# Altium PCB VA_HUB_PCB.PcbDoc (part 6 of 12)
Units mil, origin at the board's own origin, x right, y up, seen from the top; angles counter-clockwise.
Board outline 4408 x 3619 mil, 8 copper layers (Top Layer, Routing 1, Routing 2, Power Plane, GND Plane, Routing 3, Routing 4, Bottom Layer), stack 85.156 mil thick; 569 components, 440 nets, 2911 pads, 1518 vias.
Unrouted connection lines stored in the file: 46.
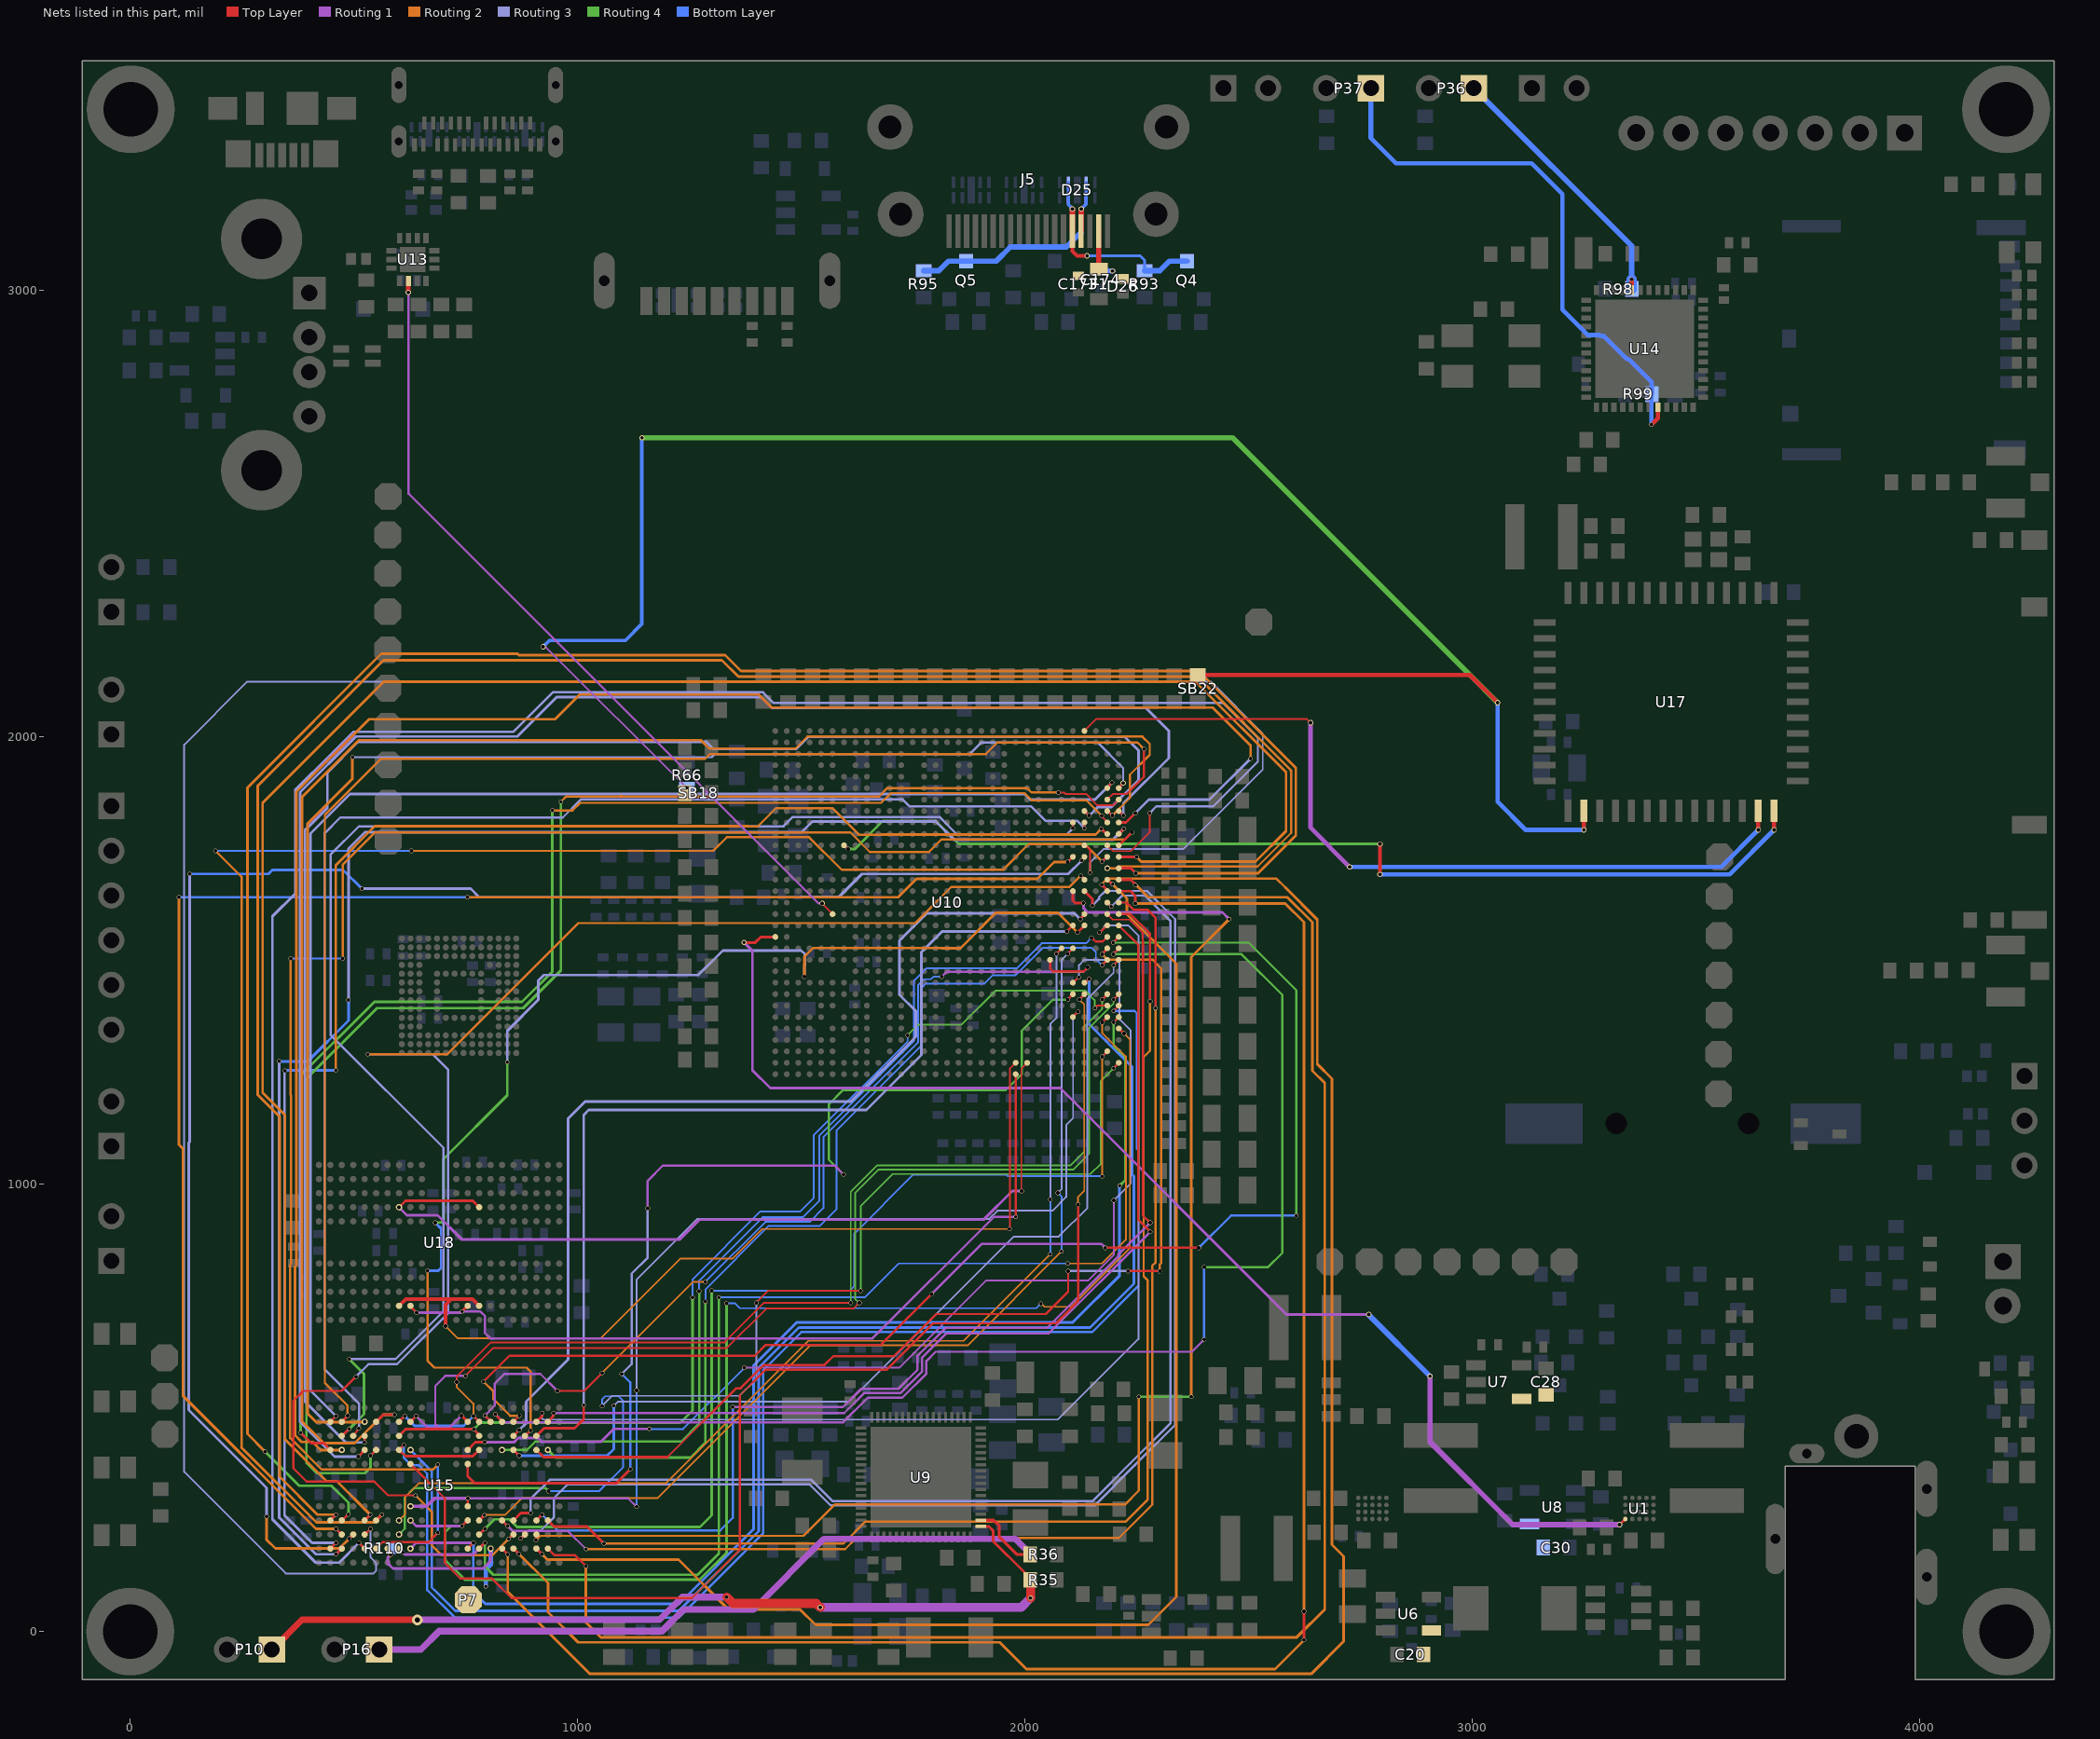
[diagram p9: the nets of this part, all layers, seen from the top]

## Part data (continued)
U15 U18: "FBGA-200 DDR SDRAM ROHS", Manufacturer=Samsung, ComponentLink1Description=LCSC, ComponentLink1URL=https://www.lcsc.com/product-detail/DDR-SDRAM_Samsung-K4F6E3S4HM-MGCJ_C2842431.html, Manufacturer Part Number=K4F6E3S4HM-MGCJ
U16: "BGA-153 eMMC ROHS", Manufacturer=FORESEE, ComponentLink1Description=LCSC, ComponentLink1URL=https://lcsc.com/product-detail/eMMC_FORESEE-FSEIASLD-64G_C719922.html, Manufacturer Part Number=FSEIASLD-64G
U17: "802.11ac/a/b/g/n 2x2 WiFi with Bluetooth5.0 Combo SIP Module", Manufacturer=SparkLAN, ComponentLink1Description=Verical, ComponentLink1URL=https://www.verical.com/pd/sparklan-communicationslnc.-combo-wireless-module-ap6398s-7079266?utm_medium=datasheet&utm_source=pdf&utm_content=link&utm_term=AP6398S&utm_campaign=datasheet_coverpage_2017, Manufacturer Part Number=AP6398S
X1 X4: "CRYSTAL 32.7680KHZ 12.5PF SMD", Case/Package=SMD/SMT, ESR (Equivalent Series Resistance)=70kR, Frequency=32.768kHz, Frequency Tolerance=20ppm, Load Capacitance=12.5pF, Manufacturer=NDK, Max Operating Temperature=85°C, Min Operating Temperature=-40°C, Package Quantity=1000, Supplier Part Number 1=644-1156-6-ND, ComponentLink1Description=https://media.digikey.com/pdf/Data%20Sheets/NDK%20PDFs/NX3215SA-32.768K-STD-MUA-8.pdf?src-supplier=Digi-Key, ComponentLink1URL=https://media.digikey.com/pdf/Data%20Sheets/NDK%20PDFs/NX3215SA-32.768K-STD-MUA-8.pdf?src-supplier=Digi-Key, ComponentLink2Description=http://www.ndk.com/images/products/catalog/c_NX3215SA-STD-MUA-14_e.pdf?src-supplier=Digi-Key, ComponentLink2URL=http://www.ndk.com/images/products/catalog/c_NX3215SA-STD-MUA-14_e.pdf?src-supplier=Digi-Key, Height=0.035inch, Lead Free="Lead Free", Length=0.126inch, Manufacturer Part Number=NX3215SA-32.768K-STD-MUA-8, Mount="Surface Mount", Number of Pins=2, Packaging="Tape and Reel", Pricing 1="1=0.68, 10=0.602, 50=0.5628, 100=0.4974, 500=0.47124, 1000=0.3927 (USD)", Stock 1=29951, Supplier 1=Digi-Key, Width=0.059inch
X2: library part X322524MOB4SI, "24MHz SMD Crystal Resonator 12pF ±10ppm ±30ppm -40℃~+85℃ SMD3225-4P Crystals ROHS", Manufacturer="Yangxing Tech", ComponentLink1Description=LCSC, ComponentLink1URL=https://www.lcsc.com/product-detail/Crystals_Yangxing-Tech-X322524MOB4SI_C70590.html, Manufacturer Part Number=X322524MOB4SI
X3: library part 5TJ480000XYLBC, "8MHz SMD Crystal Resonator 18pF 70Ω ±10ppm ±30ppm -40℃~+85℃ SMD5032-4P Crystals ROHS", Manufacturer=JYJE, ComponentLink1Description=LCSC, ComponentLink1URL=https://lcsc.com/product-detail/Crystals_JYJE-5TJ480000XYLBC_C2149247.html, Manufacturer Part Number=5TJ480000XYLBC
X5: library part Q22FA12800078, "37.4MHz SMD Crystal Resonator 9pF 60Ω ±10ppm -40℃~+85℃ SMD2016-4P Crystals", Equivalent Series Resistance (ESR)=60Ω, Load Capacitance=9pF, Frequency=37.4MHz, Mnufacturer="Seiko Epson"

## Free pads (board coordinates)
  round 196.85 hole 122.05: MH1(1,3403.64) MH2(4193.65,3403.64) MH3(0,0) MH4(4194.65,0)

## Via types
v1: diameter 9.84, hole 7.87, Top Layer to Bottom Layer, 821 vias
v2: diameter 11.81, hole 7.87, Top Layer to Bottom Layer, 575 vias
v3: diameter 23.62, hole 11.81, Top Layer to Bottom Layer, 122 vias

## Nets (pads, with @x,y where several pads share a name; then routed paths per layer and width w, separated by ;. In a path a pad name is that pad's centre, name@x,y a point inside that pad or via, vN(x,y) a via of type N, cw(c..) or ccw(c..) an arc to the next point about the centre after c; other vN are vias at no path point)
5V#: C173.1 C174.1 D26.1 F1.2 J5.18 | length 111
  Top Layer w12: J5.18@2165.3,3131.68 2165.3,3046.81 F1.2@2165.82,3046.29
  Bottom Layer w12: C174.1@2170.64,3042 v2(2196,3042)
BOOT0: P10.1 R35.2 U9.52 | length 1981.4
  Top Layer w6: U9.52@1901.73,234.95 1919.69,234.95 1928.87,225.78 1928.87,202.8 1999.87,131.8 1999.87,127.33 R35.2@2011.87,115.33
  Top Layer w15: P10.1@315.82,-42.18 384.19,26.19 v3(642,26.19)
  Top Layer w20: v1(1333.56,77.09) 1347.64,63 1533.64,63 v2(1542.82,53.82) ; R35.2@2011.87,115.33 2012.82,114.38 v2(2012.82,74.82)
  Routing 1 w15: v3(642,26.19) 1183.19,26.19 1234.09,77.09 v1(1333.56,77.09)
  Routing 1 w20: v2(1542.82,53.82) 1991.82,53.82 v2(2012.82,74.82)
BOOT0_: P36.1 R98.2 U14.44 | length 619.5
  Top Layer w10: U14.44@3356.39,2999.25 3356.61,2999.47 3356.61,3023.17 v1(3356.39,3023.39)
  Bottom Layer w12: P36.1@3003.82,3450.82 3356.39,3098.26 v1(3356.39,3023.39)
  Bottom Layer w22: v1(3356.39,3023.39) 3356.61,3023.17 3356.61,3002.04 R98.2@3356.82,3001.82
BOOT1: P16.1 R36.2 U9.53 | length 1729.5
  Top Layer w7: U9.53@1901.73,248.73 1930.27,248.73 1942.82,236.18 1942.82,211.18 1981.67,172.33 R36.2@2011.87,172.33
  Routing 1 w14: 1393.32,49.32 1551.45,207.45 1978.55,207.45 v2(2013,173)
  Routing 1 w15: P16.1@556.82,-40.18 649.82,-40.18 691,1 1189,1 1237.32,49.32 1393.32,49.32
BOOT1_: P37.1 R99.2 U14.20 | length 1256.7
  Top Layer w10: v1(3400.82,2698.82) 3415.44,2713.44 U14.20@3415.44,2737.44
  Bottom Layer w10: 2773.82,3340.82 2773.82,3338.82 2829.82,3282.82 3132.82,3282.82 3201.82,3213.82 3201.82,2955.82 3258.64,2899 3285.32,2899 3287.5,2896.82 3294.36,2896.82 3346.04,2845.14 3350.07,2845.14 3401.75,2793.46 3401.75,2766.9 R99.2@3401.82,2766.82 3400.82,2765.82 v1(3400.82,2698.82)
  Bottom Layer w12: 2773.82,3340.82 P37.1@2773.82,3450.82
BP_RT9193: C28.1 U7.4
BT_HOST_WAKE_L: U10.AA25 U17.50 | length 2280.7
  Top Layer w6: U10.AA25@1595.87,1757.87 1596.5,1757.87 1604.37,1750 v1(1605,1750)
  Top Layer w8: v2(2794,1693) v2@2794,1760.35
  Top Layer w10: v2@3675.14,1792.42 U17.50@3675.14,1835.12
  Routing 4 w6: v1(1605,1750) 1620.52,1750 1682.52,1812 1801,1812 1852,1761 v2(2794,1761)
  Bottom Layer w10: v2(2794,1693) 3575.87,1693 v2(3675.29,1792.42)
BT_REG_ON_H: R66.1 SB18.2 SB22.2 U17.38 | length 4447.1
  Top Layer w10: SB22.2@2386.82,2138.82 2995.08,2138.82 v2(3056.91,2077) ; v2@3249.94,1792.42 U17.38@3249.94,1835.12
  Routing 1 w4: v2(923,2202) 924.49,2200.51 929.79,2200.51 v2(1243.75,1886.54)
  Routing 4 w12: v2(1144,2669) 2464.91,2669 v2(3056.91,2077)
  Bottom Layer w8: v2(923,2202) 937,2216 1107,2216 1144,2253 v2(1144,2669)
  Bottom Layer w10: v2(3056.91,2077) 3056.91,1855.09 3119.58,1792.42 v2(3250.09,1792.42)
BT_WAKE_L: U10.AL4 U17.49 | length 1868.8
  Top Layer w4: U10.AL4@2133.27,2013.77 2159.5,2040 2631,2040 v2(2639,2032)
  Top Layer w10: v2@3639.7,1792.42 U17.49@3639.7,1835.12
  Routing 1 w10: v2(2639,2032) 2639,1797 v2(2726.18,1709.82)
  Bottom Layer w10: v2(2726.18,1709.82) 3557.26,1709.82 v2(3639.85,1792.42)
BYP_SPX3819: C20.1 U6.4
BYP_SPX3819_SD: C30.1 U8.4
CHG_CC0_INT_L: U10.R26 U13.5 | length 1813
  Top Layer w4: v2(1547.06,1628.11) 1547.06,1627.54 U10.R26@1570.28,1604.33
  Top Layer w8: v2(621.83,2994.22) v2@621.91,2994.3 ; U13.5@621.91,3019.92 U13.5@621.98,3019.99
  Top Layer w10: v2@621.91,2994.3 U13.5@621.91,3019.92
  Routing 1 w5: 621.83,2544.17 v2(621.83,2994.22) ; 622.83,2544.17 1538.5,1628.5 1546.67,1628.5 v2(1547.06,1628.11)
CPU_B_SLEEP_H: U1.A1 U10.N31 | length 2831.9
  Top Layer w6: v2(1372.42,1540.67) 1397.36,1540.67 1409.84,1553.14 U10.N31@1442.33,1553.14 ; v2(3329.82,238.82) U1.A1@3342.58,251.58
  Routing 1 w6: v2(1372.42,1540.67) 1391,1522.09 1391,1255 1431,1215 2079,1215 2585,709 v2(2769,709)
  Routing 1 w12: v2(2905.92,571) 2905.92,424.08 3091.18,238.82 v2(3329.82,238.82)
  Bottom Layer w12: v2@2768.5,708.5 v2@2905.46,571.54
DDC_SCL: D25.2 D25.9 J5.15 Q4.3 R93.2 | length 455.3
  Top Layer w8: J5.15@2106.25,3131.68 2106.25,3086.75 2117,3076 v2(2139,3076)
  Top Layer w12: J5.15@2106.25,3131.68 v2@2106.25,3180.93
  Bottom Layer w6: v2(2139,3076) 2258,3076 2267.82,3066.18 R93.2@2267.82,3042.82
  Bottom Layer w8: D25.2@2097.63,3240.22 2097.63,3190.72 2106.31,3182.03 v2(2106.31,3181) v2@2105.59,3181.73
  Bottom Layer w12: R93.2@2267.82,3042.82 2301.82,3042.82 2323.15,3064.15 Q4.3@2362.83,3064.15
DDC_SDA: D25.4 D25.7 J5.16 Q5.3 R95.2 | length 553
  Top Layer w12: J5.16@2125.93,3131.68 2125.93,3180.93 v2(2126,3181)
  Bottom Layer w8: v2(2126,3181) 2137,3192 D25.7@2137,3205.78 D25.4@2137,3240.22
  Bottom Layer w12: R95.2@1773.82,3042.82 1807.82,3042.82 1829.15,3064.15 Q5.3@1868.83,3064.15 1936.15,3064.15 1968,3096 2093,3096 2126,3129 v2(2126,3181)
DDR0.DDR0_A0: U10.F2 U15.H2 U15.R2 | length 2889.3
  Top Layer w5: v1@2173,1362.21 U10.F2@2184.45,1373.67
  Top Layer w6: U15.H2@601.05,185.51 601.05,184.85 v1(608.9,177) ; U15.R2@780.18,185.51 v1(792.98,198.31)
  Routing 1 w6: v1(608.9,177) 613.44,172.47 767.13,172.47 v1(792.98,198.31)
  Routing 4 w6: v1(792.98,198.31) 792.98,146.02 812,127 1268.44,127 1316,174.56 v1(1316,747)
  Routing 2 w4: v1(2096,823) 2173,823 2226,876 2226,1286 2173,1339 v1(2173,1361.87)
  Bottom Layer w4: v1(1316,747) 1642,747 1718,823 v1(2096,823)
DDR0.DDR0_A1: U10.F1 U15.J2 U15.P2 | length 2846.7
  Top Layer w5: v1@2198.59,1362.21 U10.F1@2210.04,1373.67
  Top Layer w6: U15.P2@754.59,185.51 v1(767.39,198.31)
  Routing 1 w6: v1(626.39,185.39) 639.31,198.31 v1(767.39,198.31)
  Routing 4 w6: v1(2198.59,1361.87) 2198.59,1310.41 2225,1284 2225,1010 v1(2212,997)
  Bottom Layer w6: v1(767.39,198.31) 767.39,173.14 767.13,172.88 767.13,88.87 794,62 1227,62 1393.92,228.92 1393.92,594.81 1490.03,690.92 2106.92,690.92 2212,796 v1(2212,997)
DDR0.DDR0_A2: U10.G1 U15.H9 U15.R9 | length 3379.7
  Top Layer w5: v1@2198.59,1387.8 U10.G1@2210.04,1399.26
  Top Layer w6: U15.H9@601.05,405.98 615.13,391.9 766.09,391.9 U15.R9@780.18,405.98 ; U15.H9@601.05,405.98 v1@612,416.97
  Bottom Layer w5: v1(612,417) 612,388 628.53,371.47 645.53,371.47 664,353 664,93 725.71,31.29 1226.7,31.29 1415.42,220.02 1415.42,584.42 1500.42,669.42 2150.57,669.42 2254.42,773.27 2254.42,1075.92 2250.67,1079.67 2250.67,1382.33 2245.54,1387.46 v1(2198.59,1387.46)
DDR0.DDR0_A3: U10.G2 U15.H10 U15.R10 | length 2305.2
  Top Layer w5: v1(2157,1394) 2162.6,1399.6 2184.11,1399.6 U10.G2@2184.41,1399.3
  Top Layer w6: U15.H10@601.05,437.48 615.84,452.28 v1(768.39,452.28) 768.39,451.24 780.18,439.44 U15.R10@780.18,437.48
  Routing 4 w4: v1(1738,1333) 1762,1357 1859,1357 1935,1433 2135,1433 2156,1412 v1@2156,1394
  Routing 4 w6: v1(768.39,452.28) 783.11,467 1229.88,467 1257,494.12 v1(1257,747)
  Bottom Layer w4: v1(1257,747) 1257,787 1409.32,939.32 1498.16,939.32 1528,969.16 1528,1109.13 1738,1319.13 v1(1738,1333)
DDR0.DDR0_A4: U10.H2 U15.H11 U15.R11 | length 2440.2
  Top Layer w4: v1(730,558) 730,570 806.73,646.73 1328.73,646.73 1417,735 v1(1611,735)
  Top Layer w5: v1@2173,1413.39 U10.H2@2184.45,1424.85
  Top Layer w6: U15.H11@601.05,468.98 U15.H11@601.05,468.98 613.84,481.84 v1(613.84,481.9) ; v1(767.39,481.77) U15.R11@780.18,468.98
  Routing 4 w4: v1@1611,736 1611,789 1611,983 1670.5,1042.5 2102.5,1042.5 2133,1073 2133,1352 2173,1392 v1(2173,1413.05)
  Routing 2 w4: v1(730,558) 730,547 767.39,509.61 v1(767.39,481.77)
  Bottom Layer w5: v1@613.84,481.77 v1(613.84,481.9)
  Bottom Layer w6: v1@613.84,481.77 635.62,460 745.61,460 v1(767.39,481.77)
DDR0.DDR0_A5: U10.H1 U15.J11 U15.P11 | length 2474.4
  Top Layer w4: v1(749.5,571.5) 812,634 1334,634 1422,722 1617,722 v1(1630,735)
  Top Layer w5: v1@2198.59,1413.39 U10.H1@2210.04,1424.85
  Top Layer w6: U15.J11@626.64,468.98 U15.J11@626.64,468.98 639.43,481.84 v1(639.43,481.9) ; v1(740.5,483.07) 745.14,478.43 U15.P11@754.59,468.98
  Routing 1 w5: 689.32,456 682,463.32 682,549 704.5,571.5 v1(749.5,571.5)
  Routing 1 w6: v1(639.43,481.9) 639.43,481.77 665.21,456 689.32,456 713.43,456 v1(740.5,483.07)
  Routing 4 w4: v1(1630,735) 1620.82,744.18 1620.82,794.73 1620.82,980.09 1673.73,1033 2108.56,1033 2144,1068.44 2144,1350 2198.59,1404.59 v1(2198.59,1413.05)
DDR0_CKE0: U10.E1 U15.J4 U15.P4 | length 2943.4
  Top Layer w5: U10.E1@2210.39,1348.42 v1@2221.84,1336.97
  Top Layer w6: v1(741.79,235.71) U15.P4@754.59,248.5
  Routing 1 w6: v1(626.64,248.5) 639.43,235.71 v1(741.79,235.71)
  Routing 4 w6: v1(741.79,235.71) 717.71,235.71 704,222 704,160.11 748.11,116 1273,116 1333,176 v1(1333,734)
  Routing 2 w4: v1(2036,733) 2037.44,733 2044.44,726 2104,726 2235,857 2235,1324.15 v1(2222.19,1336.97)
  Bottom Layer w4: v1(1333,734) 1352,734 1363,723 2026,723 v1(2036,733)
DDR0_CKE1: U10.F5 U15.J5 U15.P5 | length 2525.5
  Top Layer w5: U10.F5@2107.68,1374.36 v1@2119.13,1385.81
  Top Layer w6: v1@754,298 754.59,297.41 U15.P5@754.59,280
  Routing 1 w5: v1(755,298) 1113,298 v1(1132,279)
  Routing 1 w8: v1(626.89,280) 662.89,280 680.89,298 v1(755,298)
  Routing 3 w4: v1(1132,539) 1132,787 1267.82,922.82 1920.82,922.82 1939,941 2062,941 2092.82,971.82 2092.82,1132.82 2108,1148 2108,1375.02 v1(2119.13,1386.16)
  Bottom Layer w4: v1(1132,279) v1(1132,539)
DDR0_CLK0N: U10.J4 U15.J9 | length 3172.6
  Top Layer w5: U10.J4@2133.27,1451.13 2134.87,1451.13 2142.74,1459 v1(2144,1459)
  Bottom Layer w5: v1(626.64,405.98) 674,358.62 674,99 683,90
  Bottom Layer w6: 683,90 727,46 1226.56,46 1404.92,224.37 1404.92,590.25 1494.59,679.92 2146.22,679.92 2243.92,777.62 2243.92,1017.85 2240.17,1021.6 2240.17,1261.83 2144,1358 v1(2144,1459)
DDR0_CLK0P: U10.H4 U15.J8 | length 2875.6
  Top Layer w5: U15.J8@626.64,374.49 703.35,297.78 703.35,153.65 738,119 808.5,119 852.5,75 1255.56,75 1363,182.44 1363,528 1420,585 1691,585 1795,689 2070,689 2119,738 v1@2119,951 ; v1@2121.82,1413.39 U10.H4@2133.27,1424.85
  Routing 2 w4: v1(2119,955) 2119,971.59 2133,985.59 2133,1401.87 v1(2121.82,1413.05)
DDR0_CLK1N: U10.J5 U15.P9 | length 2454.9
  Top Layer w5: U10.J5@2107.68,1451.13 2108.79,1451.13 2120.24,1462.58 v1(2121,1462.58)
  Top Layer w6: U15.P9@754.59,405.98 772,423.39 792,423.39 v1(792.39,423.78)
  Routing 1 w4: v1(1373,590) 1719,590 1914,785 2142,785 2199,842 v1(2199,964)
  Routing 1 w6: v1(792.39,423.78) 858.86,423.78 867.65,432.57 911.76,432.57 920.24,424.08 1052.08,424.08 1081,453 v1(1161,453)
  Routing 3 w4: v1(2121,1462.58) 2121,1490 2133,1502 2204,1502 2212,1494 2212,1369 2237,1344 2237,1002 v1(2199,964)
  Bottom Layer w4: v1(1161,453) 1236,453 v1(1373,590)
DDR0_CLK1P: U10.H5 U15.P8 | length 2421.8
  Top Layer w5: v1@2096.23,1413.39 U10.H5@2107.68,1424.85
  Top Layer w6: U15.P8@754.59,374.49 754.59,347.41 770,332 1087,332 v1(1118,363)
  Routing 1 w5: v1(1157,946.22) 1157,1008 1191,1042 1575,1042 v1(1595,1022)
  Routing 4 w5: v1(1595,1022) 1562,1055 1562,1179 1593,1210 1957,1210 1993,1246 1993,1343 2063.05,1413.05 v1(2096.23,1413.05)
  Routing 3 w5: v1(1099,576) 1121,598 1121,800 1157,836 v1(1157,946.22)
  Bottom Layer w5: v1(1099,576) 1118,557 v1(1118,363)
DDR0_CS0N: U10.M6 U15.H4 | length 2418.6
  Top Layer w5: v1@2070.64,1515.76 U10.M6@2082.09,1527.21
  Routing 2 w4: v1(601.05,248.38) 614.82,262.15 614.82,300.82 646,332 1198,332 1516,650 1863,650 v1(2057,844)
  Routing 3 w4: v1(2057,966) 2057,1358 2070.64,1371.64 v1(2070.64,1515.41)
  Bottom Layer w4: v1(2057,844) v1(2057,966)
DDR0_CS1N: U10.B1 U15.H3 | length 2619.1
  Top Layer w4: v1@1400,736 1426,762 v1(1633,762)
  Top Layer w5: v1@2198.59,1259.85 U10.B1@2210.04,1271.3
  Routing 4 w4: v1(1633,762) 1633,950.82 1705.18,1023 2146.82,1023 2170,1046.18 2170,1230.91 v1(2198.59,1259.5)
  Routing 4 w5: v1(601.05,217.01) 614,229.96 614,300 635,321 928,321 v1(935,314)
  Routing 3 w4: v1(1055,504) 1078,527 1362,527 1400,565 v1@1400,736
  Bottom Layer w4: v1(935,314) 1048,314 1102,368 1102,516 1092,526 1062,526 1055,519 v1(1055,504)
  other v1: 1400,735
DDR0_CS2N: U10.M5 U15.R4 | length 2245.1
  Top Layer w5: v1@2096.23,1515.76 U10.M5@2107.68,1527.21
  Top Layer w6: U15.R4@780.18,248.5 v1(792.12,260.44)
  Routing 2 w4: v1(792.12,260.44) 837.94,260.44 875.5,298 1178.14,298 1520.14,640 1872,640 v1(2082,850)
  Routing 3 w4: v1(2074,981) 2082,989 2082,1501.18 v1(2096.23,1515.41)
  Bottom Layer w4: v1(2074,981) 2082,973 v1(2082,850)
DDR0_CS3N: U10.C2 U15.R3 | length 2387.4
  Top Layer w5: v1(2173,1285.1) 2173,1285.44 U10.C2@2184.45,1296.89
  Top Layer w6: U15.R3@780.18,217.01 v1(792.98,229.8)
  Routing 4 w6: v1(792.98,229.8) 814.17,251 848,251 865,234 1274,234 1300,260 v1(1300,762)
  Routing 2 w4: v1(2173,1018) v1(2173,1285.1)
  Bottom Layer w4: v1(1300,762) 1608,762 1619,773 1619,890 1750,1021 1959.21,1021 1962.21,1018 v1(2173,1018)
DDR0_D0: U10.AB2 U15.B2 | length 3537.4
  Top Layer w6: U15.B2@447.5,185.51 447.5,185.57 460.3,198.37 v1(460.3,198.43) ; v1(2171,1794.92) 2178.97,1786.96 2179.06,1786.96 2182.56,1783.46 U10.AB2@2184.45,1783.46
  Routing 2 w5: 1381,1800.59 1403.59,1800.59 1444.1,1841.1 1569.82,1841.1 1629,1781.92 1679.81,1781.92
  Routing 2 w6: v1(459.66,1255) 459.66,1713.51 546.75,1800.59 1381,1800.59 ; 1679.81,1781.92 1715.19,1781.92 1715.35,1782.08 2158.16,1782.08 v1(2171,1794.92)
  Routing 3 w6: v1(346,1254) 345.26,1253.26 345.26,1250.55 345,1250.28 345,755.48 345,260 406.69,198.31 460.17,198.31 v1(460.3,198.43)
  Bottom Layer w6: v1@347,1254 347.5,1254.5 459.16,1254.5 v1(459.66,1255)
DDR0_D1: U10.AB1 U15.C2 | length 3577.8
  Top Layer w6: v1(460.3,172.59) v1(460.3,172.59) 473.09,185.45 U15.C2@473.09,185.51 ; U10.AB1@2210,1783.09 v1@2221.6,1794.69
  Routing 3 w6: 332.92,254.08 v1(332.92,1275) ; 333.92,254.08 415.28,172.72 460.17,172.72 v1(460.3,172.59) ; v1(488,1412) 488,1751 524.5,1787.5 1242.58,1787.5 1243.08,1787 1501,1787 1524.97,1810.97 1801.03,1810.97 1841.08,1770.92 2197.64,1770.92 v1(2221.6,1794.88)
  Bottom Layer w6: v1@333.92,1275 397,1275 488,1366 v1(488,1412)
DDR0_D2: U10.AA2 U15.E2 | length 4709.9
  Top Layer w4: U10.AA2@2184.45,1757.87 2197.25,1745.07 2237.07,1745.07 2279,1787 v1(2279,1830)
  Top Layer w6: v1(511.48,198.31) U15.E2@524.28,185.51
  Routing 3 w5: 449.87,1962.42 477.66,1990.21 477.84,1990.21 499.62,2012 857,2012 945,2100 1414.85,2100 1438.69,2076.15 2443.85,2076.15 2521,1999 2521,1945 2421,1845 2294,1845 v1(2279,1830)
  Routing 3 w6: 449.87,1962.42 369,1881.56 369,1650 318,1599 318,251 414.98,154.02 467.19,154.02 v1(511.48,198.31)
DDR0_D3: U10.AA1 U15.F2 | length 3942.8
  Top Layer w5: U15.F2@549.87,185.51 564.35,200 667,200 v1(688,221) ; U10.AA1@2210.04,1757.87 2210.87,1757.87 v1(2240,1787)
  Routing 2 w5: v1(359,1505) 359,1199.91 359.26,1199.64 359.26,821.62 357.74,820.09 357.74,432.61 428.28,362.07 676.65,362.07 v1(688,373.42) ; v1(475,1504.98) 475,1714 548,1787 1609.78,1787 1653.71,1743.06 1785.79,1743.06 1813.72,1771 2224,1771 v1(2240,1787)
  Bottom Layer w5: v1(359,1505) v1(475,1504.98) ; v1(688,221) v1(688,373.42) v1@688,375
DDR0_D4: U10.Y2 U15.F4 | length 3848.2
  Top Layer w6: U15.F4@549.87,248.5 549.93,248.5 562.72,261.3 v1(562.79,261.3) ; v1(2172.7,1721.82) 2183.16,1732.28 U10.Y2@2184.45,1732.28
  Routing 1 w6: v1@562.28,261.8 v1(562.79,261.3)
  Routing 2 w5: v1(191,1745.59) 249,1687.59 249,411.56 ; v1(628.82,1745.59) 1303.24,1745.59 1333.64,1776 1518,1776 1591,1703 1951,1703 2009,1761 2133.53,1761 v1(2172.7,1721.82)
  Routing 2 w6: 249,411.56 416.56,244 545.49,244 v1(562.79,261.3)
  Bottom Layer w5: v1(191,1745.59) v1(628.82,1745.59)
DDR0_D5: U10.Y1 U15.E4 | length 4745
  Top Layer w6: U15.E4@524.28,248.5 U15.E4@524.28,248.5 536.94,261.24 v1(536.94,261.3) ; U10.Y1@2210.04,1732.28 2210.18,1732.14 2249.86,1732.14 v1(2250,1732)
  Routing 2 w6: v1(536.94,261.3) 462.24,336 439.5,336 346,429.5 346,1155 296,1205 296,1853 567,2124 2381.44,2124 2584,1921.44 2584,1790 2515.82,1721.82 2260.18,1721.82 v1(2250,1732)
DDR0_D6: U10.W1 U15.C4 | length 4941
  Top Layer w6: U15.C4@473.09,248.5 473.8,248.5 487.3,262 v1(488,262) ; U10.W1@2210.04,1706.69 2237.08,1706.69 v1(2248,1695.76)
  Routing 4 w6: v1(302,402) 378,326 450,326 488,288 v1(488,262)
  Routing 2 w6: v1(302,402) 262,442 262,1886.71 561.29,2186 866,2186 869,2183 1330.38,2183 1365.38,2148 2389,2148 2606.03,1930.97 2606.03,1780.03 2521.76,1695.76 v1(2248,1695.76)
DDR0_D7: U10.W2 U15.B4 | length 4859.5
  Top Layer w5: U10.W2@2182.96,1708.19 v1(2184.45,1706.69)
  Top Layer w6: U15.B4@447.5,248.5 447.5,248.69 460.05,261.24 v1(460.05,261.43)
  Routing 1 w6: v1(460.05,261.43) v1@460.17,261.55
  Routing 2 w5: v1(2184.45,1706.69) 2204.69,1706.69 2208.69,1710.69 2520.69,1710.69 2595.53,1785.53 2595.53,1923.5 2595.03,1924
  Routing 2 w6: v1(460.05,261.43) 418.57,261.43 333.92,346.08 333.92,1151.08 285,1200 285,1891 566,2172 1323,2172 1360,2135 2386,2135 2595.03,1925.97 2595.03,1924
DDR0_D8: U10.AF2 U15.B11 | length 3210.6
  Top Layer w6: U15.B11@447.5,468.98 v1(460.3,481.77) ; U10.AF2@2184.45,1885.82 2184.45,1887.42 v1(2195.11,1898.08)
  Routing 4 w6: v1@460.17,481.9 v1(460.3,481.77)
  Routing 3 w6: v1@460.17,481.9 403,539.07 403,1784 491.63,1872.63 1999.37,1872.63 2012,1860 2157.03,1860 v1(2195.11,1898.08)
DDR0_D9: U10.AE2 U15.C11 | length 3453.5
  Top Layer w4: U10.AE2@2184.45,1860.23 2197.25,1873.03 2228.03,1873.03 2238,1883
  Top Layer w5: 2238,1883 2266.4,1911.4 2266.4,1972.56 v1(2266.84,1973)
  Top Layer w6: U15.C11@473.09,468.98 473.09,469.54 486,482.44 v1(486,483)
  Routing 2 w5: v1(486,483) 486,505.13 435.08,556.05 435.08,1826.08 560,1951 1285,1951 1296,1962 1913,1962 1939,1988 2251.84,1988 v1(2266.84,1973)
DDR0_D10: U10.AF1 U15.E11 | length 3454.2
  Top Layer w6: U10.AF1@2210.04,1885.82 2210.04,1886.43 2220,1896.39 v2(2220,1897)
  Routing 2 w6: v1(497,1955) 497,1907.17 397,1807.17 397,487 415.76,468.24 523.54,468.24 v1(524.28,468.98)
  Routing 3 w5: v1(497,1955) 1300,1955 1307,1962 1877,1962 1903,1988 2162.66,1988 2220,1930.66 v2(2220,1897)
DDR0_D11: U10.AD2 U15.F11 | length 3880.5
  Top Layer w6: U15.F11@549.87,468.98 565.89,485 v1(591,485) ; U10.AD2@2185.28,1834.64 2185.39,1834.64 2195.11,1824.92 v1(2196.05,1824.92)
  Routing 2 w5: 1285.5,1983.5 1295,1974 1487,1974 1514,2001 2263,2001 2279.26,1984.74 2279.26,1960.26 2235,1916 2235,1863.87 v1(2196.05,1824.92)
  Routing 2 w6: v1(591,485) 566,485 502,421 432.76,421 384,469.76 384,1866 511,1993 1276,1993 1285.5,1983.5
DDR0_D12: U10.AE1 U15.F9 | length 3389.8
  Top Layer w4: v1(2075,1876) 2088,1876 2091,1873 2137,1873 2162.56,1847.44 2197.25,1847.44 U10.AE1@2210.04,1860.23
  Top Layer w6: v1(537.07,393.19) U15.F9@549.87,405.98
  Routing 4 w6: v1(537.07,393.19) 537.2,393.06 537.2,366.75 524.44,354 418,354 394.08,377.92 394.08,1236.08 551.82,1393.82 878.55,1393.82 963,1478.27 v1(963,1855.35)
  Routing 2 w5: v1(963,1855.35) 975,1867.35 1097,1867.35 1674.35,1867.35 1693,1886 2005.14,1886 2015.14,1876 v1(2075,1876)
  Routing 2 w6: 1097,1868 1098,1869
DDR0_D13: U10.AD1 U15.E9 | length 3898.5
  Top Layer w6: v1(510,391) 510,391.35 524.28,405.63 U15.E9@524.28,405.98 ; U10.AD1@2210,1834.13 2210.93,1834.13 2220.14,1824.92 v1(2220.53,1824.92)
  Routing 3 w6: v1(510,391) 457,391 380,468 380,1877 504.47,2001.47 865.47,2001.47 953.5,2089.5 1410.5,2089.5 1434.35,2065.65 2270.35,2065.65 2322,2014 2322,1953 2220.53,1851.53 v1(2220.53,1824.92)
DDR0_D14: U10.AC1 U15.C9 | length 4212.6
  Top Layer w6: U10.AC1@2210.04,1809.05 2226.05,1809.05 v1(2247,1830)
  Routing 2 w6: v1(473.09,405.98) 426.02,405.98 408,424 383,424 368.24,438.76 368.24,815.74 371.92,819.43 371.92,1878.02 533.91,2040 950,2040 1005,2095 1405,2095 1434.09,2065.91 2420.09,2065.91 2505,1981 v1(2505,1952)
  Routing 3 w6: v1(2247,1830) 2277,1860 2413,1860 v1(2505,1952)
DDR0_D15: U10.AC2 U15.B9 | length 3186
  Top Layer w4: v1(2171.85,1824.12) U10.AC2@2184.45,1809.05
  Top Layer w6: v1(381.16,444.76) 404.92,421 432.49,421 U15.B9@447.5,405.98
  Routing 4 w6: v1(381.16,444.76) 381.16,1243.16 545.96,1407.96 875.96,1407.96 944,1476 v1(944,1836)
  Routing 2 w5: v1(944,1836) 989,1836 1005.82,1852.82 1678.82,1852.82 1700.75,1874.75 1999.25,1874.75 2015.41,1858.59 2137.38,1858.59 v1(2171.85,1824.12) ; v1(2171.85,1824.12) v1@2172.85,1825.15
DDR0_D16: U10.V1 U15.AA2 | length 3938.5
  Top Layer w5: U15.AA2@933.72,185.51 948.8,170.44 994.56,170.44 v1(1019,146)
  Top Layer w6: U15.AA2@933.72,185.51 U15.AA2@933.83,185.51 ; U10.V1@2210.04,1681.1 2236.82,1681.1 v1@2247,1670.92
  Routing 2 w6: v1@1019,145.63 1019,20 1051.8,-12.8 2608.2,-12.8 2670.53,49.53 2670.53,1226.47 2643,1254 2643,1586 2587,1642 2275.92,1642 v1@2247,1670.92
  other v1: 2247,1668.92
DDR0_D17: U10.V2 U15.Y2 | length 3195.3
  Top Layer w6: U15.Y2@908.13,185.51 v1(920.93,172.72) ; U10.V2@2184.45,1681.1 2185.29,1681.1 2195.47,1670.92 v1(2196.31,1670.92)
  Routing 2 w6: v1(920.93,172.72) 932.65,161 1226,161 1338,49 1498,49 1531.99,15.01 2276.01,15.01 2338.5,77.5 2338.5,1493.5 2228,1604 2228,1639.23 v1(2196.31,1670.92)
DDR0_D18: U10.U1 U15.V2 | length 4002.1
  Top Layer w6: U15.V2@856.51,186.05 v1(869.31,173.25) ; U10.U1@2210.04,1655.51 2236.31,1655.51 2247,1644.82 v1(2247,1627.82) ; v1(2624,-19.09) v1(2624,45)
  Routing 2 w6: v1(869.31,173.25) 934,108.56 934,43.27 1001.27,-24 1944,-24 2003.81,-83.81 2559.28,-83.81 v1(2624,-19.09) ; v1(2247,1627.82) 2582.18,1627.82 2624,1586 v1(2624,45)
DDR0_D19: U10.U2 U15.U2 | length 4261.7
  Top Layer w6: U15.U2@831.36,185.51 U15.U2@831.42,185.51 ; U15.U2@831.51,185.05 v1(844.31,172.25) ; v1(2172,1670) 2181.22,1660.78 2181.22,1660.63 2183.11,1658.74 2183.11,1656.85 U10.U2@2184.45,1655.51 ; v1@2172.74,1671.74 2172.74,1670.3 v1@2173.77,1669.26
  Routing 4 w6: v1@844.03,171.97 v1(844.31,172.25)
  Routing 2 w5: v1@2173,1672 2184.34,1683.34 2562.66,1683.34 2582,1664
  Routing 2 w6: v1(844.31,172.25) 844.03,171.97 844.03,88.97 1027.81,-94.81 2640.19,-94.81 2713,-22 2713,168 2687,194 2687,1236 2654,1269 2654,1592 2582,1664
DDR0_D20: U10.T1 U15.U4 | length 2932.9
  Top Layer w5: U10.T1@2210.04,1629.92 2227.08,1629.92 2243,1614 2274,1614 2292.58,1595.42 v1(2292.58,1394)
  Top Layer w6: U15.U4@831.36,248.5 843.87,236 v1(844,236)
  Routing 1 w5: 978.31,225 v1(1019,184.31)
  Routing 1 w6: v1(844,236) 855,225 978.31,225
  Routing 2 w5: v1(1019,184.31) 1598.31,184.31 1623,209 2210,209 2285,284 2285,818 2292.58,825.58 v1(2292.58,1394)
DDR0_D21: U10.T2 U15.V4 | length 2917.7
  Top Layer w5: U10.T2@2184.45,1629.92 v1(2193.37,1621)
  Top Layer w6: U15.V4@856.95,248.5 873.45,265 v1(895,265)
  Routing 3 w5: v1(895,265) 895,296 938.19,339.19 1522.95,339.19 1570.14,292 2151.96,292 2236.23,376.27 2236.23,376.37 2326,466.14 2326,1588.15 2268.65,1645.5 2217.87,1645.5 v1(2193.37,1621)
DDR0_D22: U10.R2 U15.Y4 | length 2594.6
  Top Layer w4: U10.R2@2184.45,1604.33 2196.95,1591.83 2234.17,1591.83 2264,1562 2264,1543.5
  Top Layer w5: 2264,1543.5 2264,930.16 v1(2280.16,914)
  Top Layer w6: U15.Y4@908.13,248.5 v1(920.93,261.3)
  Routing 1 w5: v1(1347,502) 1593.67,502 1634.67,543 1717.86,543 1760,585.14 1760,616.28 1822.72,679 2049.44,679 2208.5,838.07 2208.5,842.34 v1(2280.16,914)
  Bottom Layer w5: v1(920.93,261.3) 956.23,226 1318.86,226 1347,254.14 v1(1347,502)
DDR0_D23: U10.R1 U15.AA4 | length 2766.7
  Top Layer w5: U10.R1@2210.04,1604.33 2235.82,1604.33 2280.16,1559.98 v1(2280.16,1409)
  Top Layer w6: U15.AA4@933.72,248.5 947.81,234.42 1021.58,234.42 v1(1059.27,196.73)
  Routing 2 w5: v1(1059.27,196.73) 1594.73,196.73 1644,246 2226,246 2275,295 2275,785.17 2265.77,794.4 2265.77,1284.58 2280.16,1298.96 v1(2280.16,1409)
DDR0_D24: U10.P1 U15.AA11 | length 2258.7
  Top Layer w5: U10.P1@2210.04,1578.74 2254,1534.78 2254,920.16 v1(2280.16,894)
  Top Layer w6: U15.AA11@933.72,468.98 945.79,481.04 945.79,487.69 v1(946.52,488.42)
  Routing 1 w5: v1(946.52,488.42) 1596.42,488.42 1641,533 1722,533 1770,581 1770,612.14 1824.86,667 2053.61,667 2280.16,893.55 v1(2280.16,894)
DDR0_D25: U10.P2 U15.Y11 | length 2476.3
  Top Layer w6: U15.Y11@908.13,468.98 920.41,481.25 920.41,487.9 v1(920.93,488.42) ; v1(2167,1563) 2167.86,1563 2183.59,1578.74 U10.P2@2184.45,1578.74
  Routing 3 w4: v1(920.93,488.42) 920.93,476.34 923.27,474 2074,474 2254,654 2254,1556 2231,1579 2179.94,1579 2177.11,1576.17 2177.11,1573.11 v1(2167,1563)
DDR0_D26: U10.N1 U15.V11 | length 3093.8
  Top Layer w5: v1(790,559) 847.72,616.72 1396.72,616.72 1421,641 1678,641 v1(1791.97,754.97) ; U15.V11@856.95,469.46 v1(870,482.51) ; v1(2180,858) v1(2389,858) ; v1(2197.44,1540.25) 2197.44,1540.4 2209.84,1552.8 U10.N1@2210.04,1552.8
  Routing 1 w5: v1(1791.97,754.97) 1904,867 2171,867 v1(2180,858)
  Routing 4 w5: v1(2197.44,1540.25) 2500.75,1540.25 2607,1434 v1(2607,930)
  Routing 2 w5: v1(790,559) 812,537 812,519.83 849.32,482.51 v1(870,482.51)
  Bottom Layer w5: v1(2389,858) 2461,930 v1(2607,930)
DDR0_D27: U10.M1 U15.U11 | length 3067.9
  Top Layer w5: v1(2198.11,1514.41) 2198.11,1515.01 2210.04,1526.95 U10.M1@2210.04,1527.21
  Top Layer w6: v1(816.44,485.85) 816.44,484.88 831.36,469.95 U15.U11@831.36,468.98
  Routing 1 w5: v1(816.44,485.85) 834.29,468 1594,468 1649,523 1726.14,523 1780,576.86 1780,605 1800.59,625.59 2373.59,625.59 v1(2401,653)
  Routing 4 w5: v1(2198.11,1514.41) 2484.59,1514.41 2576,1423 2576,847 2544,815 v1(2401,815)
  Bottom Layer w5: v1(2401,653) v1(2401,815)
DDR0_D28: U10.N2 U15.U9 | length 2186.2
  Top Layer w5: v1(2149,1551) 2150.24,1551 2158.4,1542.84 2174.15,1542.84 U10.N2@2184.45,1553.14
  Routing 4 w5: v1(831.36,405.86) 886.86,405.86 906,425 1232,425 1272,465 v1(1272,761)
  Bottom Layer w4: v1(1272,761) 1272,784.86 1413.73,926.59 1503.44,926.59 1540.73,963.88 1540.73,1109.13 1752.33,1320.73 1752.33,1455 1780.17,1482.84 1981.84,1482.84 2038,1539 2137,1539 v1(2149,1551)
DDR0_D29: U10.L1 U15.V9 | length 2158.2
  Top Layer w5: v1(2198.59,1489.57) 2198.59,1490.04 2210.04,1501.49 U10.L1@2210.04,1501.62
  Top Layer w6: U15.V9@856.95,405.98 v1(869.75,393.19)
  Routing 3 w4: v1(1081,505) 1090,514 1607,514 1976,883 2076,883 2140,947 2140,1415 2198.59,1473.59 v1(2198.59,1489.57)
  Bottom Layer w6: v1(869.75,393.19) 1066.19,393.19 1081,408 v1(1081,505)
DDR0_D30: U10.M2 U15.Y9 | length 2440.2
  Top Layer w5: 1201.41,390.41 1355,544 1364.86,544 1416.86,596 1552.36,596 1572.39,616.04 1707.89,616.04 1801.86,710 2047,710 2097,760 v1(2097,806) ; v1(2173,1514.41) 2173,1515.26 2184.45,1526.71 U10.M2@2184.45,1527.21 ; v1(2231,806) v1(2302,806)
  Top Layer w6: U15.Y9@908.13,405.98 923.7,390.41 1201.41,390.41
  Routing 2 w5: v1(2173,1514.41) 2185.42,1501.99 2286.01,1501.99 2305,1483 2305,823.86 2302,820.86 v1(2302,806)
  Routing 3 w5: v1(2097,806) v1(2231,806)
DDR0_D31: U10.L2 U15.AA9 | length 2140.1
  Top Layer w5: v1(2173,1489.57) 2173,1490.04 2184.45,1501.49 U10.L2@2184.45,1501.62
  Routing 4 w6: v1(933.72,406.11) 950.83,389 1253,389 1286,422 v1(1286,737.78)
  Bottom Layer w4: v1(1286,737.78) 1286,765 1428,907 1542,907 1578.92,943.92 1578.92,1119.92 1770.33,1311.33 1770.33,1440.22 1779.1,1449 1910.14,1449 1928.14,1467 1979,1467 2041,1529 2148.71,1529 2159,1518.71 2159,1503.57 v1(2173,1489.57)
DDR0_DM0: U10.Y5 U15.C3 | length 3638.2
  Top Layer w6: v1(460.3,229.8) U15.C3@473.09,217.01 ; v1@2096.22,1720.82 U10.Y5@2107.68,1732.28
  Routing 2 w6: v1(108.98,1642) 108.98,1088.49 118,1079.47 118,527 415.07,229.93 460.17,229.93 v1(460.3,229.8) ; v1(754.01,1642.01) 1717.01,1642.01 1758,1683 2028,1683 2065.82,1720.82 v1(2095.93,1720.82)
  Bottom Layer w6: v1(108.98,1642) v1@754.15,1642
DDR0_DM1: U10.AC5 U15.C10 | length 3315.3
  Top Layer w5: v1@2107.31,1796.92 2107.49,1797.11 U10.AC5@2107.49,1808.64
  Top Layer w6: U15.C10@473.09,437.48 473.79,437.48 489.31,453 v1(490,453)
  Routing 4 w6: v1(490,453) 523,486 523,576 v1(490,609)
  Routing 3 w5: v1(490,609) 593,609 700.42,716.42 700.42,1081.58 448,1334 448,1737 511.59,1800.59 1460.59,1800.59 1481.47,1821.47 1809.48,1821.47 1849.37,1781.58 2092.96,1781.58 v1(2107.31,1795.92)
DDR0_DM2: U10.U5 U15.Y3 | length 3231.6
  Top Layer w6: v1(907,204) 907.57,204.57 907.57,216.44 U15.Y3@908.13,217.01 ; U10.U5@2107.68,1655.51 2107.68,1634.32 2113.26,1628.74 v1(2131,1628.74)
  Routing 1 w6: v1(2131,1628.74) 2131,1618 2141,1608 2442,1608 v1(2457,1593)
  Routing 4 w5: v1(2255,525) v1(2372,525)
  Routing 2 w5: v1(907,204) 917,214 1505,214 1575,284 2224,284 2255,315 v1(2255,525)
  Routing 2 w6: v1(2372,525) 2372,1508 v1(2457,1593)
DDR0_DM3: U10.P5 U15.Y10 | length 2205.3
  Top Layer w6: U15.Y10@908.13,437.48 925.54,454.89 993.89,454.89 1014,475 v1(1014,506) ; v1(2094,1565.08) 2107.63,1578.7 U10.P5@2107.68,1578.74
  Routing 3 w6: v1(1014,506) 1014,1155 1025,1166 1646,1166 1769,1289 1769,1519 1815.08,1565.08 v1(2094,1565.08)
DDR0_DQS0M: U10.AA4 U15.E3 | length 5428.8
  Top Layer w4: U10.AA4@2135.13,1757.87 2146,1747 v1(2146,1697)
  Top Layer w6: U15.E3@524.28,217.01 v1(537.07,229.8) ; U10.AA4@2133.27,1757.87 U10.AA4@2135.13,1757.87
  Routing 3 w4: v1(537.07,229.8) 537.07,166.54 549.73,153.88 549.73,135.66 544.07,130 348,130 120.9,357.1 120.9,1982.9 262,2124 2416,2124 2532,2008 2532,1927.25 2354.75,1750 2176.29,1750 2146,1719.71 v1(2146,1697)
DDR0_DQS0P: U10.Y4 U15.D3 | length 3833.9
  Top Layer w6: v1(490,208) 490,208.16 498.69,216.85 U15.D3@498.69,217.01
  Routing 2 w6: v1(305,257) 305,205 324.49,185.51 467.51,185.51 v1(490,208)
  Routing 3 w6: v1(132.82,1694) 132.82,1094.89 131,1093.07 131,495 300.71,325.29 305,321 v1(305,257) ; v1(518,1661) 761,1661 779.99,1642.01 1498.29,1642.01 1499.27,1643 1585,1643 1636,1694 2097,1694 v1(2127,1724)
  Bottom Layer w6: v1(132.82,1694) 309,1694 318,1703 476,1703 v1(518,1661)
DDR0_DQS1M: U10.AD4 U15.E10 | length 3708.4
  Top Layer w6: v1(524,423) 524.14,423.14 524.14,437.34 U15.E10@524.28,437.48 ; U10.AD4@2133.27,1834.77 2133.54,1834.77 2143.39,1824.92 v1(2143.8,1824.92)
  Routing 3 w6: v1(524,423) 482,423 391,514 391,1792 441,1842 441,1921 509.09,1989.09 1287.91,1989.09 1303,1974 1489,1974 1516,2001 1652.4,2001 1652.55,2000.85 1692.73,2000.85 1692.88,2001 1741.91,2001 1742.06,2000.85 1795.24,2000.85 1795.5,2001.11 2222.89,2001.11 2254,1970 2254,1904 2193,1843 2162.73,1843 2144.65,1824.92 v1(2143.8,1824.92)
DDR0_DQS1P: U10.AC4 U15.D10 | length 3151.9
  Top Layer w5: U15.D10@498.69,437.48 v1(511,454) ; v1@2133.27,1796.92 U10.AC4@2133.27,1809.05
  Routing 3 w5: v1(511,454) 511.48,454.48 511.48,509.52 435,586 435,1785.31 469.69,1820 967,1820 1008,1861 1726,1861 1741.68,1845.32 2013.68,1845.32 2046,1813 2117,1813 v1@2133.08,1796.92
  other v1: 2133.08,1795.92
DDR0_DQS2M: U10.V4 U15.V3 | length 3723.6
  Top Layer w5: v1(505,570) 473,538 387,538 365,516 365,365 395,335 546.05,335 576.46,304.59 637.41,304.59 v1(638,304)
  Top Layer w6: v1(846,207) 856.01,217.01 U15.V3@856.95,217.01 ; v1(2125,1690) 2125,1689.68 2133.27,1681.41 U10.V4@2133.27,1681.1
  Routing 2 w5: v1(531,1291) 709,1291 1002,1584 1755,1584 1836,1665 2100,1665 v1(2125,1690) ; v1(638,304) 674,268 674,193 696,171 810,171 v1(846,207)
  Routing 3 w5: v1(505,570) 533,598 596.43,598 660.51,662.07 661.07,662.07 711,712 711,1256 676,1291 v1(531,1291)
DDR0_DQS2P: U10.U4 U15.W3 | length 3043.7
  Top Layer w6: v1(873,208.23) 873.38,208.23 882.16,217.01 U15.W3@882.54,217.01 ; U10.U4@2133.27,1655.51 2151,1637.78 v1(2151,1623)
  Routing 3 w5: v1(873,208.23) 890.77,226 918.14,226 947,254.86 947,298 978.19,329.19 1518.81,329.19 1566,282 2156.1,282 2246.23,372.13 2246.23,372.23 2336,462 2336,1593 2273,1656 2180,1656 2165.96,1641.96 2165.96,1637.96 v1(2151,1623)
DDR0_DQS3M: U10.R4 U15.V10 | length 2291.8
  Top Layer w6: U15.V10@856.95,437.48 v1(869.75,450.28) ; v1(2124,1593) 2124,1594.03 2132.79,1602.82 U10.R4@2133.82,1602.82
  Routing 3 w6: v1(869.75,450.28) 885,465.53 885,514 979.16,608.16 979.16,1147.16 1017,1185 1611,1185 1756,1330 1756,1387.67 1720,1423.67 1720,1544.84 1781.08,1605.92 2111.08,1605.92 v1(2124,1593)
DDR0_DQS3P: U10.P4 U15.W10 | length 2791.3
  Top Layer w6: U15.W10@882.54,437.48 883.1,437.48 894.78,449.16 v1(895.34,449.16) ; v1(2118,1563) 2118,1563.23 2133.27,1578.5 U10.P4@2133.27,1578.74
  Routing 1 w5: v1(895.34,449.16) v1@895.34,450.28
  Routing 4 w6: v1(682,914) 682.74,914.74 695.74,914.74 701,920 701,1057 843,1199 v1(843,1273)
  Routing 2 w5: v1(665,807) 665,704.88 665.14,704.74 665.14,604.86 680,590 886,590 895.34,580.66 v1(895.34,449.16) ; 1526,1528 1770.7,1528
  Routing 2 w6: v1(1507,1464) 1507,1509 1526,1528 ; 1770.7,1528 1770.99,1528.29 1813.43,1528.29 1813.64,1528.08 1856.08,1528.08 1935,1607 2074,1607 v1(2118,1563)
  Routing 3 w6: v1(843,1273) 843,1343 912,1412 912,1455 925,1468 1270,1468 1324.91,1522.91 1500.09,1522.91 1508,1515 1508,1490.52 1507,1489.52 v1(1507,1464)
  Bottom Layer w6: v1(665,807) 689,807 695,813 695,901 v1(682,914)
DDR0_ODT0: P7.1 R110.2 U15.G2 U15.T2 | length 405.1
  Top Layer w10: U15.G2@575.46,185.51 v1(582,172) ; P7.1@756,71 P7.1@765,71
  Routing 1 w6: v1(582,172) 582,170.96 575.46,164.42 575.46,152.98 587.51,140.92 788.92,140.92 805.72,157.72 805.72,185.45 v1(805.9,185.64)
  Bottom Layer w10: v1(795,101) 795,137.87 805.9,148.77 v1(805.9,185.64)
DDR0_RST: U10.L7 U15.T11 | length 2121.4
  Top Layer w5: v1(955,538) 1015,538 v1(1055,578) ; U10.L7@2056.5,1501.96 2056.5,1482.5 2063,1476 2132,1476 v1(2141,1485)
  Top Layer w6: v1(792.98,483.08) 805.77,470.28 U15.T11@805.77,468.98
  Routing 1 w5: v1(792.98,483.08) 815,505.1 815,554.57 836.43,576 917,576 v1(955,538) ; v1(1814,1464) 1825,1475 2131,1475 v1(2141,1485)
  Routing 2 w4: v1(1055,578) 1259,782 v1(1286,782)
  Bottom Layer w4: v1(1286,782) 1420,916 1519,916 1549.73,946.73 1549.73,1105.4 1761.33,1317 1761.33,1445.33 1774.5,1458.5 1790.25,1458.5 1795.75,1464 v1(1814,1464)
DDR1.DDR1_A0: U10.B10 U18.H2 U18.R2 | length 2007.4
  Top Layer w4: v1@1966.68,900 1966.68,1258.6 U10.B10@1979.73,1271.65
  Top Layer w8: U18.H2@601.05,728.27 616.13,743.35 717.35,743.35 ; v1(705,683) 705,731 717.35,743.35 ; U18.R2@780.18,728.27 765.09,743.35 717.35,743.35
  Routing 2 w4: v1(705,683) 732,656 1053,656 1231,834 1347,834 1413,900 v1(1966,900)
DDR1.DDR1_A1: U10.A10 U18.J2 U18.P2 | length 1858.5
  Top Layer w6: U18.J2@626.64,728.27 626.64,726.57 v1(640.26,712.95) ; v1(741.79,715.47) U18.P2@754.59,728.27 ; U10.A10@1979.73,1246.06 1979.86,1245.92 1979.86,927.14 v1(1980,927)
  Routing 1 w5: v1(741.79,715.47) 783.03,715.47 792.98,705.52 792.98,667.52 804.94,655.56 1659.56,655.56 1931,927 v1(1980,927)
  Routing 1 w6: v1(640.26,712.95) 738.23,712.95 740.75,715.47 v1(741.79,715.47)
DDR1.DDR1_A2: U10.B9 U18.H9 U18.R9 | length 1945.5
  Top Layer w4: v1@1992.27,987.03 1992.27,1258.6 U10.B9@2005.32,1271.65
  Top Layer w6: v1(601.05,948.74) 615.13,962.83 766.09,962.83 U18.R9@780.18,948.74
  Routing 1 w6: v1(601.05,948.74) 618.79,931 687,931 741,877 1228.56,877 1272.56,921 1908,921 1971.93,984.93 1991.23,984.93 v1@1991.23,985
  other v1: 1993,985